# Altium PCB iR-Blaster.PcbDoc
Units mil, origin at the board's own origin, x right, y up, seen from the top; angles counter-clockwise.
Board outline 1958.66 x 1633.86 mil, 2 copper layers (Top Layer, Bottom Layer), stack 59.055 mil thick; 49 components, 32 nets, 174 pads, 48 vias.
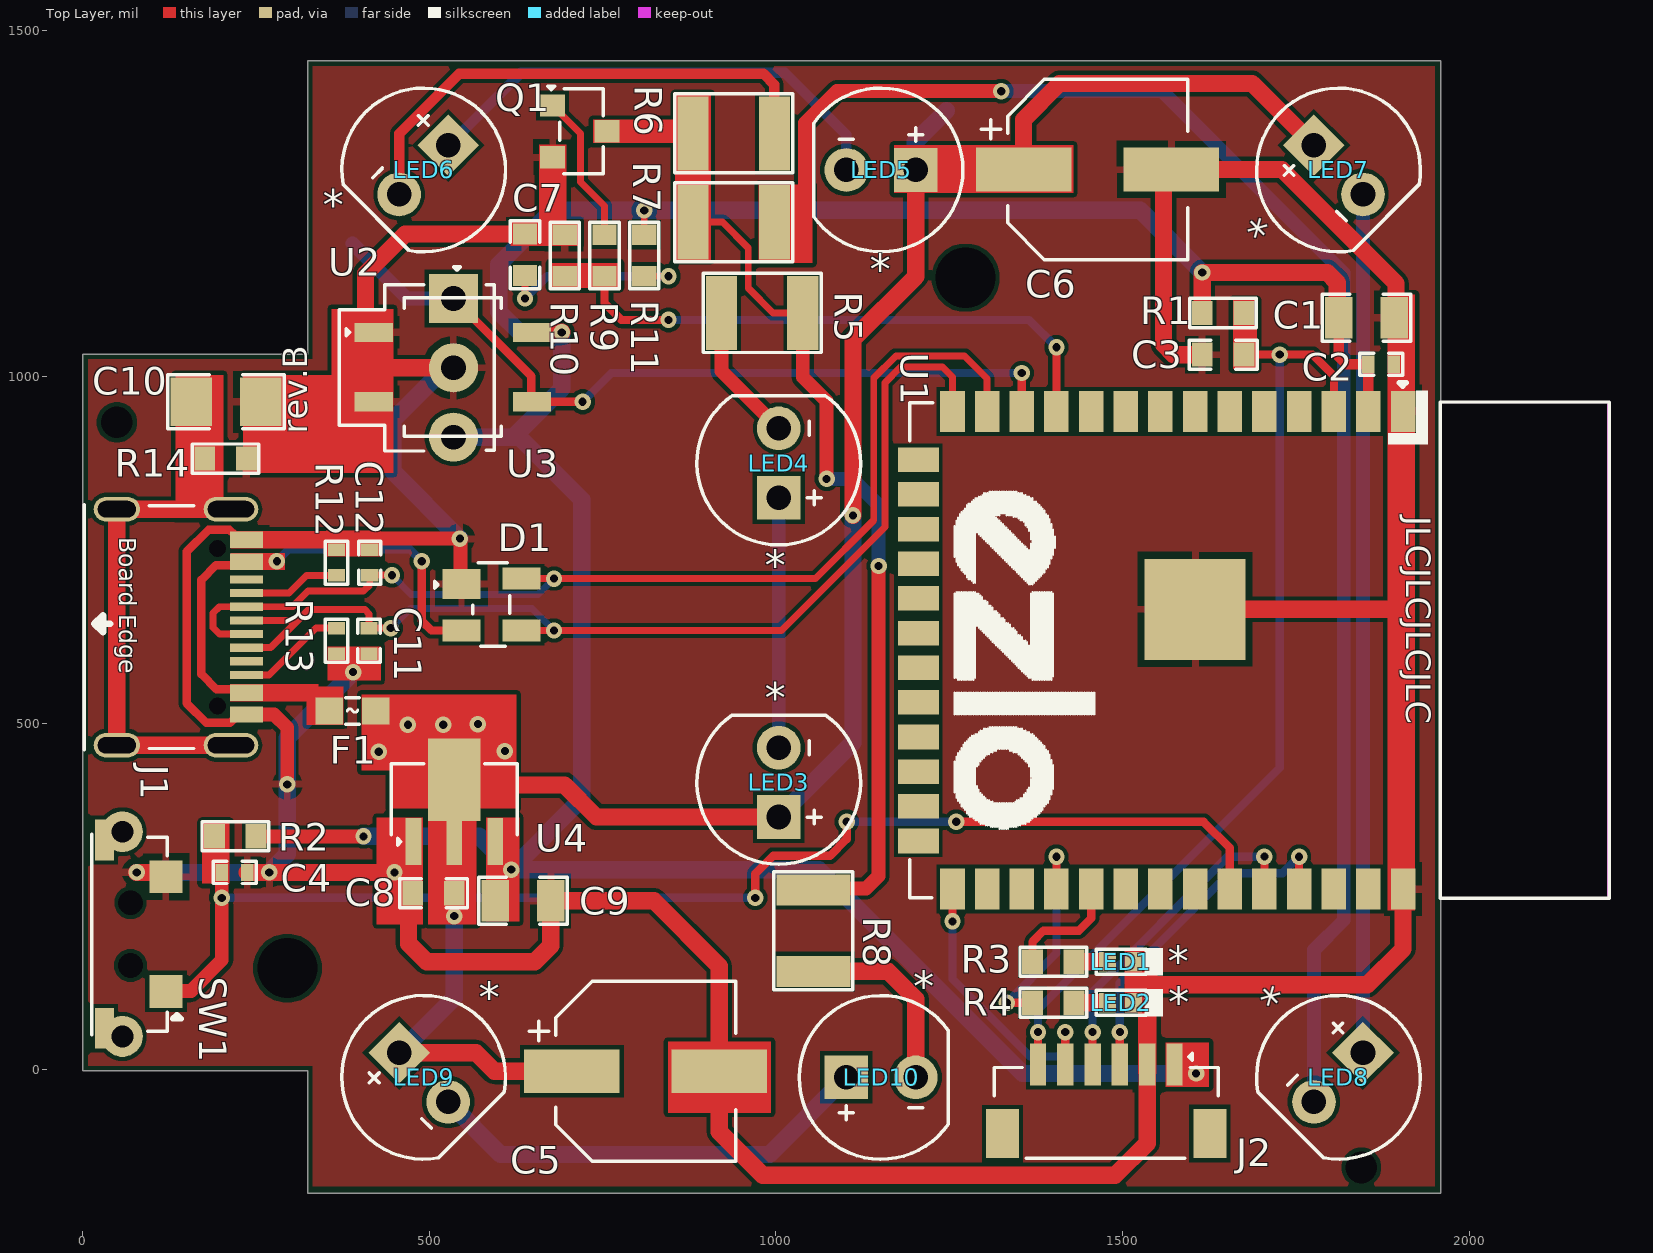
[diagram p0: Top Layer view]
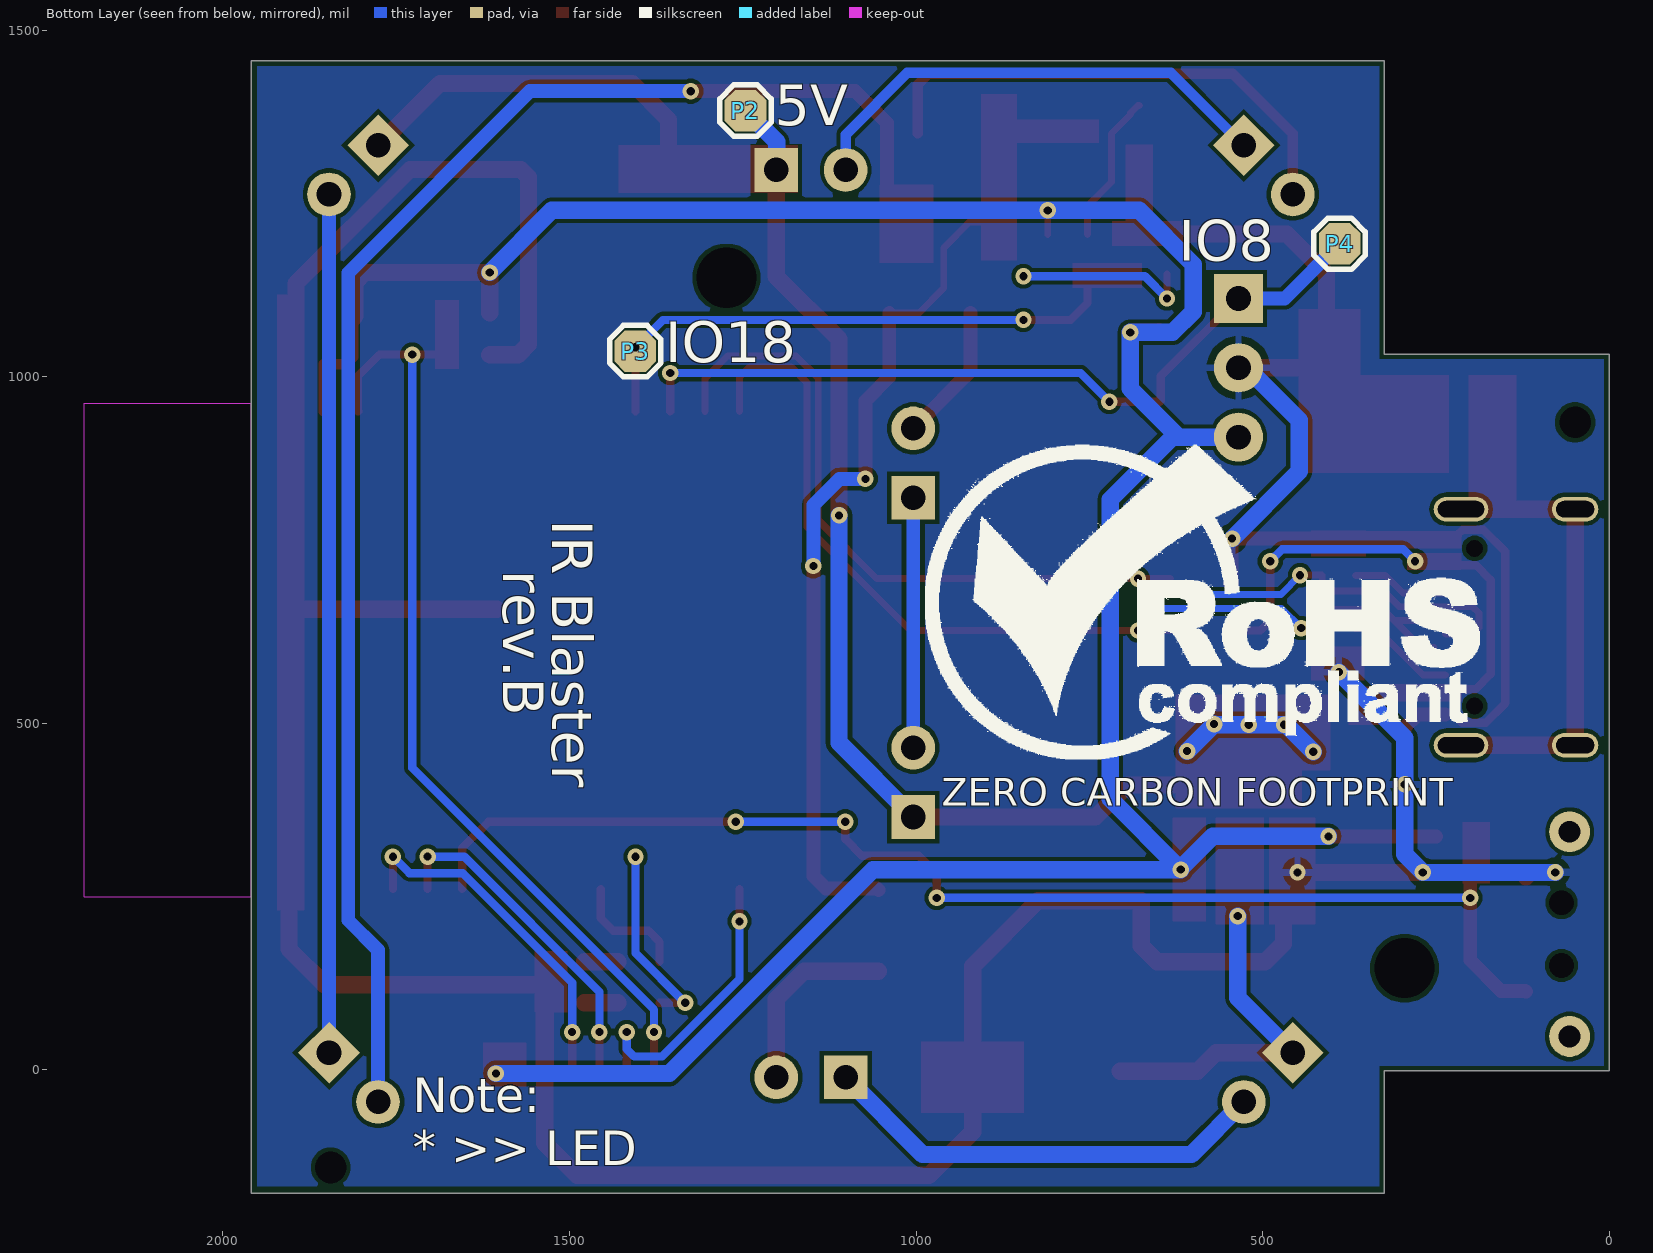
[diagram p1: Bottom Layer view, seen from below]
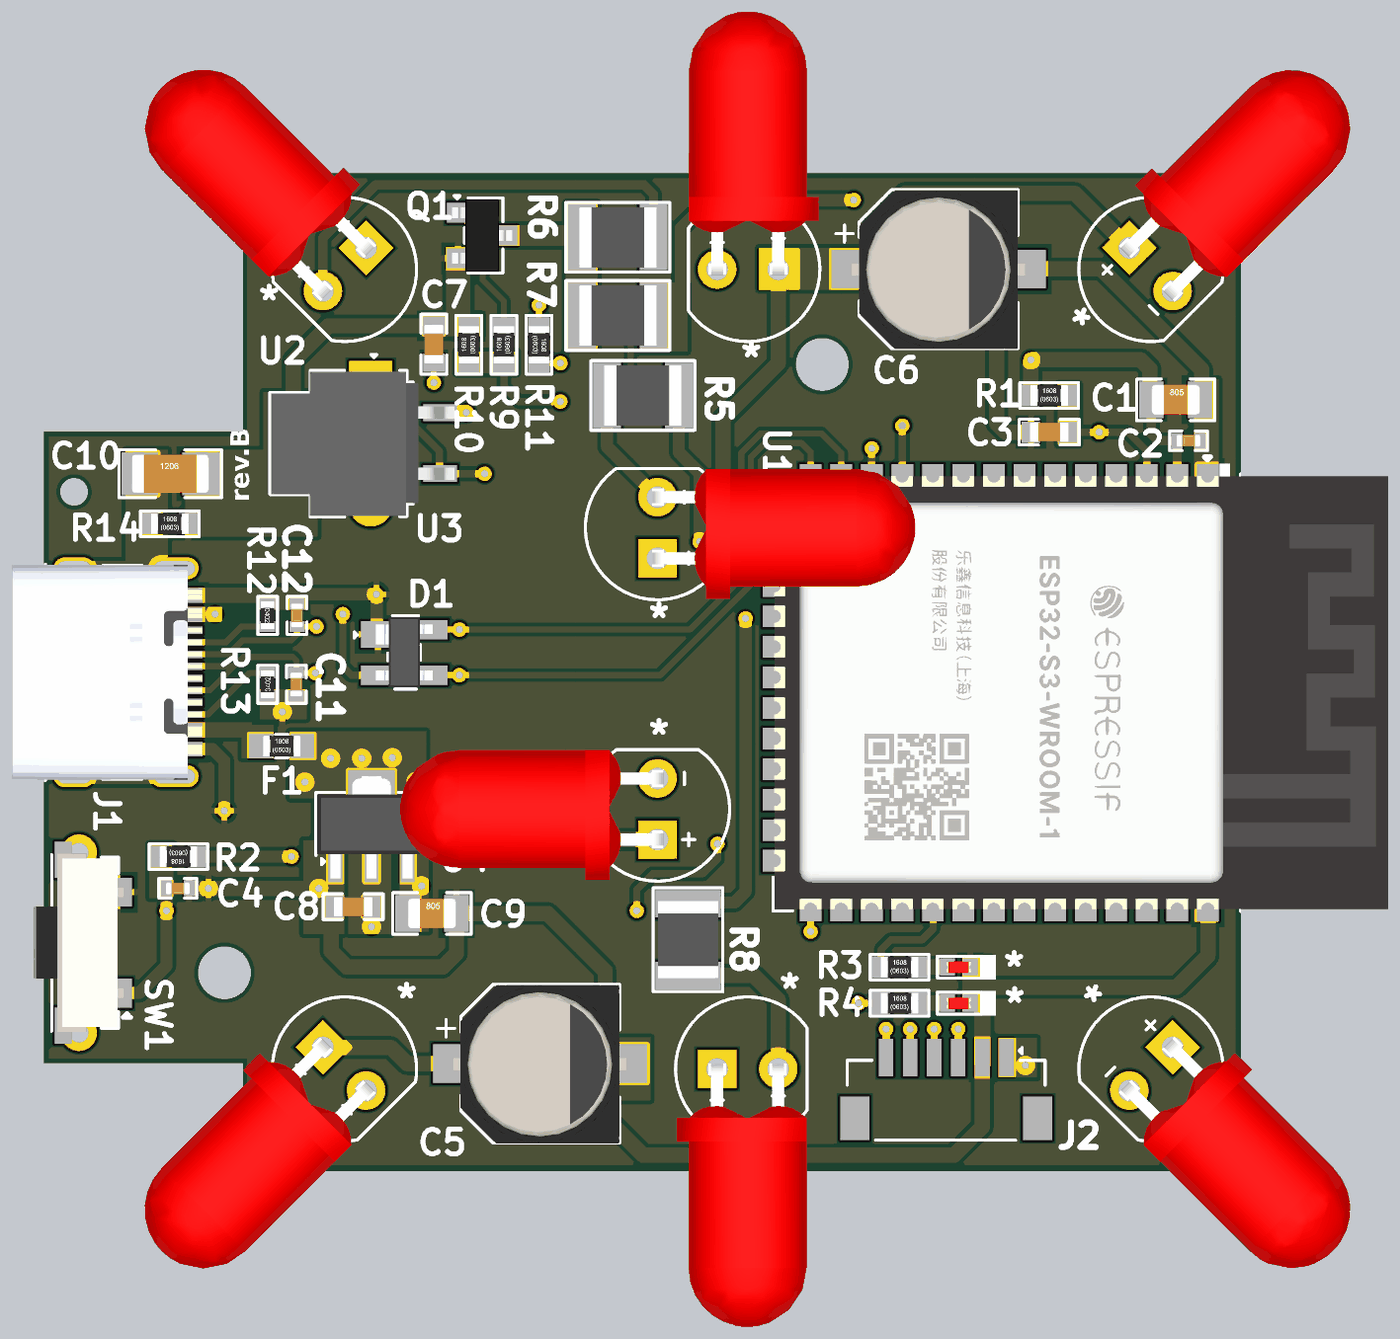
[diagram p2: 3D render of the assembled board from above, using the file's embedded part models]

## Layer stack, top to bottom
Top Solder: solder mask 0.4, Solder Resist, Dk 3.5
Top Layer: signal copper 1.378
Dielectric 2: prepreg 7.874, PP-006, Dk 4.1
Dielectric 1: core 40.551, FR-4, Dk 4.8
Dielectric 3: prepreg 7.874, PP-006, Dk 4.1
Bottom Layer: signal copper 1.378
Bottom Solder: solder mask 0.4, Solder Resist, Dk 3.5

## Board outline
0,-0.83 324.8,-0.83 324.8,-178 1958.66,-178 1958.66,1455.86 324.8,1455.86 324.8,1032.63 0,1032.63

## Design rules (kind name [scope] priority, off if disabled: settings)
Clearance [All] p1: gap=6 ignorepadtopadclearanceinfootprint=FALSE
ComponentClearance [All] p1: gap=0 collisioncheckmode=3 verticalgap=0 showdistances=FALSE
HoleSize [All] p1: absolutevalues=TRUE maxlimit=1000 minlimit=1 maxpercent=80.000 minpercent=20.000
HoleToHoleClearance [All] p1: gap=0 allowstackedmicrovias=TRUE
MinimumSolderMaskSliver [All] p1: minsoldermaskwidth=0
PolygonConnect [All] p1: connectstyle=Relief reliefconductorwidth=10 reliefentries=4 polygonreliefangle="90 Angle" airgapwidth=10
RoutingVias [All] p1: holewidth=11.81 width=23.62 viastyle="Through Hole" minholewidth=11.81 minwidth=23.62 maxholewidth=31.5 maxwidth=62.99
SilkToSilkClearance [All] p1: silktosilkclearance=0
SilkToSolderMaskClearance [IsPad] p1: minsilkscreentomaskgap=0 clearancetoexposedcopper=TRUE
SolderMaskExpansion [All] p1: expansion=4 istentingtop=FALSE
Width [All] p1: maxlimit=25 minlimit=10 preferedwidth=15
24 further rules are at their usual default settings.

## Classes and differential pairs
component class "USB & LDO_Section": C8 C9 C10 C11 C12 D1 F1 J1 R12 R13 R14 U4
component class iR_Receiver_Section: C7 P4 R11 U2 U3
component class iR-Blaster_Section: C5 C6 LED3 LED4 LED5 LED6 LED7 LED8 LED9 LED10 P2 P3 Q1 R5 R6 R7 R8 R9 R10
component class Controller_Section: C1 C2 C3 C4 J2 LED1 LED2 R1 R2 R3 R4 SW1 U1

## Components (designator, comment, footprint, x,y, rotation, side; value= is the part's Value field where it differs from the comment)
C1 "22uF" Cap-0805 1852,1085 r0 top locked
C2 "0.1uF" Cap-0402 1873,1018 r0 top locked
C3 "1uF" Cap-0603 1645,1032 r0 top locked
C4 "0.1uF" Cap-0402 219,285 r180 top locked
C5 "220uF" RT1A221M0605 812,-2 r0 top locked
C6 "220uF" RT1A221M0605 1464,1299 r0 top locked
C7 "4.7UF" Cap-0603 638,1176 r270 top locked
C8 "10uF" Cap-0603 506,255 r180 top locked
C9 "22uF" Cap-0805 635,244 r0 top locked
C10 "4.7nF" Cap-1206 206.66,963.86 r0 top locked
C11 "TBD" Cap-0402 413,619 r270 top locked
C12 "TBD" Cap-0402 414,732 r90 top locked
D1 "SP0503BAHTG" SOT-143-4_ 546.39,700.93 r0 top locked
F1 "BSMD0603L-100" fuse-0603 389,518 r0 top locked
J1 "TYPE-C-31-M-12" TYPE-C-31-M-12_ 236.22,764.72 r270 top locked
J2 "Voltlink Target" "Voltlink Target" 1476.38,-41.7 r180 top locked
LED1 "Green" LED-0402 1497,156 r0 top locked
LED2 "Red" LED-0402 1497,97 r0 top locked
LED3 "IR333-A" "IR333-A Cut" 1004,414.91 r270 top locked
LED4 "IR333-A" IR333_A 1004,875.54 r90 top locked
LED5 "IR333-A" IR333_A 1151.57,1298.38 r180 top locked
LED6 "IR333-A" IR333_A 491.73,1298.38 r225 top locked
LED7 "IR333-A" "IR333-A CUT" 1811.42,1298.38 r135 top locked
LED8 "IR333-A" "IR333-A CUT" 1811.42,-10.68 r45 top locked
LED9 "IR333-A" IR333_A 491.73,-10.68 r315 top locked
LED10 "IR333-A" IR333_A 1151.57,-10.68 r0 top locked
P2 "TEST POINT" Test-point 1246,1384 r180 bottom locked
P3 "TEST POINT" Test-point 1405,1037 r180 bottom locked
P4 "TEST POINT" Test-point 389,1192 r180 bottom locked
Q1 "YJL2302B" SOT-23-3L_ 717,1354 r270 top locked
R1 "10K" RES-0603 1645,1092 r180 top locked
R2 "10K" RES-0603 220,337 r0 top locked
R3 "330R" Res-0603 1400,156 r180 top locked
R4 "330R" Res-0603 1400,97 r180 top locked
R5 "27R" Res_1210 980,1092 r180 top locked
R6 "27R" Res_1210 939,1351 r0 top locked
R7 "27R" Res_1210 939,1223 r0 top locked
R8 "27R" Res_1210 1054,201 r270 top locked
R9 "100R" Res-0603 752.67,1175 r270 top locked
R10 "10K" RES-0603 695.33,1175 r270 top locked
R11 "100R" Res-0603 810,1175 r90 top locked
R12 "5.1K" Res-0402 366,732 r270 top locked
R13 "5.1K" Res-0402 366,619 r90 top locked
R14 "1M" Res-0603 206,882 r180 top locked
SW1 "YTS-B003-2A" YTS-B003-2A 75.79,196.02 r90 top locked
U1 "ESP32-S3-WROOM-1-N4" "41-SMD Module" 1555,605.51 r270 top locked
U2 "IRM-H638T/TR2" SMD-4,4x5mm 534,1014 r0 top locked
U3 "IRM-3638T" SIP-3P-2.54mm 534.83,1012.94 r270 top locked
U4 "LR1107G-33-AB3-C-R" SOT-89-3 536,374 r0 top locked

## Footprints (in the part's own frame and the unit in brackets; to place one, negate y for a bottom-side part, rotate by r counter-clockwise, add the part's x,y. Pads: shape width x height; smd on the part's side, far side on the other; paste and mask are expansions set on the pad)
"41-SMD Module" [mm]
  rect 1.5x0.9 smd: 1(-8.75,8.88) 2(-8.75,7.61) 3(-8.75,6.34) 4(-8.75,5.07) 5(-8.75,3.8) 6(-8.75,2.53) 7(-8.75,1.26) 8(-8.75,-0.01) 9(-8.75,-1.28) 10(-8.75,-2.55) 11(-8.75,-3.82) 12(-8.75,-5.09) 13(-8.75,-6.36) 14(-8.75,-7.63) 27(8.75,-7.63) 28(8.75,-6.36) 29(8.75,-5.09) 30(8.75,-3.82) 31(8.75,-2.55) 32(8.75,-1.28) 33(8.75,-0.01) 34(8.75,1.26) 35(8.75,2.53) 36(8.75,3.8) 37(8.75,5.07) 38(8.75,6.34) 39(8.75,7.61) 40(8.75,8.88)
  rect 0.9x1.5 smd: 15(-6.98,-8.88) 16(-5.71,-8.88) 17(-4.44,-8.88) 18(-3.17,-8.88) 19(-1.9,-8.88) 20(-0.63,-8.88) 21(0.64,-8.88) 22(1.91,-8.88) 23(3.18,-8.88) 24(4.45,-8.88) 25(5.72,-8.88) 26(6.99,-8.88)
  rect 3.7x3.7 smd: 41(-1.5,1.26)
  Keep-Out Layer region: -9.042,10.285 9.042,10.285 9.042,16.381 -9.042,16.381
  silkscreen extent -9.8,-9.2 9.09,16.43, body extent -9.01,-9.14 9.01,16.37, height 3.16
Cap-0402 [mil]
  rect 18x25 smd mask+2.36: 1(-18.5,0) 2(18.5,0)
  silkscreen extent -31,-16 31,16, body extent -20,-10 20,10, height 19
Cap-0603 [mil]
  rect 30x35 smd mask+2.36: 1(-30,0) 2(30,0)
  silkscreen extent -49,-21 49,21, body extent -32,-16 31,16, height 34
Cap-0805 [mil] "SMD 0805"
  rect 40x60 smd mask+2.76: 1(-40,0) 2(40,0)
  silkscreen extent -64,-34 64,34, body extent -39,-25 39,25, height 30
Cap-1206 [mil] "SMD 1206"
  rect 60x70 smd: 1(-50,0) 2(50,0)
  silkscreen extent -84,-39 84,39, body extent -63,-31 63,32, height 39
fuse-0603 [mm]
  rect 1x1 smd: 1(-0.85,0) 2(0.85,0)
  silkscreen extent -0.25,-0.48 0.25,0.48, body extent -0.77,-0.42 0.78,0.43, height 0.45
"IR333-A Cut" [mm]
  rect 1.6x1.6 hole 0.9: 1(1.27,0)
  round 1.6 hole 0.9: 2(-1.27,0)
  silkscreen extent -2.47,-3 3,3, body extent -2.45,-10.7 2.95,0.25, height 7.95
"IR333-A CUT" [mm]
  rect 1.6x1.6 hole 0.9: 1(1.27,0)
  round 1.6 hole 0.9: 2(-1.27,0)
  silkscreen extent -2.47,-3 3,3, body extent -2.45,-10.7 2.95,0.25, height 7.95
IR333_A [mm]
  rect 1.6x1.6 hole 0.9: 1(-1.27,0)
  round 1.6 hole 0.9: 2(1.27,0)
  silkscreen extent -3,-3 2.47,3, body extent -2.95,-10.72 2.45,0.23, height 7.95
LED-0402 [mm]
  rect 0.62x0.72 smd: 1(-0.475,0) 2(0.475,0)
  silkscreen extent -0.89,-0.51 1.55,0.51, body extent -0.5,-0.25 0.51,0.25, height 0.45
Res-0402 [mil]
  rect 18x25 smd mask+2.17: 1(-18.5,0) 2(18.5,0)
  silkscreen extent -32,-17 32,16, body extent -23,-11 23,11, height 16
RES-0603 [mil]
  rect 30x35 smd: 1(-30,0) 2(30,0)
  silkscreen extent -48,-21 48,21, body extent -31,-17 31,17, height 18
Res-0603 [mil]
  rect 30x35 smd: 1(-30,0) 2(30,0)
  silkscreen extent -48,-21 48,21, body extent -31,-17 31,17, height 18
Res_1210 [mm]
  rect 1.14x2.72 smd: 1(-1.49,0) 2(1.49,0)
  silkscreen extent -2.16,-1.45 2.16,1.45, body extent -1.6,-1.25 1.6,1.25, height 0.7
RT1A221M0605 [mm]
  rect 3.5x1.6 smd: 1(-2.7,0) 2(2.7,0)
  silkscreen extent -4.27,-3.3 3.3,3.3, body extent -3.61,-3.33 3.59,3.27, height 5.4
SIP-3P-2.54mm [mm]
  rect 1.8x1.8 hole 0.9: 1(-2.54,0)
  round 1.8 hole 0.9: 2(0,0) 3(2.54,0)
  silkscreen extent -3.71,-4.19 3.05,1.5, body extent -3,-4.14 3,1.46, height 8.35
SMD-4,4x5mm [mm]
  rect 1.4x0.7 smd: 1(-2.9,1.27) 2(-2.9,-1.27) 3(2.9,-1.27) 4(2.9,1.27)
  silkscreen extent -3.91,-2.54 1.78,2.54, body extent -3.5,-2.5 3.5,2.5, height 3.99
SOT-23-3L_ [mm]
  rect 0.82x0.92 smd: 1(-0.95,-1) 2(0.95,-1) 3(0,1)
  silkscreen extent -1.65,-1.17 1.56,0.86, body extent -1.5,-1.25 1.5,1.25, height 1.1
SOT-89-3 [mm]
  rect 0.58x1.73 smd: 1(-1.5,-1.132) 2(0,-1.132) 3(1.5,-1.132)
  rect 1.933x3.03 smd: 2(0,1.132)
  silkscreen extent -2.31,-1.27 2.31,1.73, body extent -2.25,-1.84 2.25,2.41, height 1.54
SOT-143-4_ [mm]
  rect 1.4x1.1 smd: 1(0,0)
  rect 1.4x0.8 smd: 2(0,-1.7) 3(2.2,-1.7) 4(2.2,0.2)
  silkscreen extent -0.99,-2.27 1.76,0.77, body extent -0.08,-2.21 2.29,0.71, height 1.22
Test-point [mil]
  oct 60x60 smd: 1(0,0)
  silkscreen extent -37,-37 37,37
TYPE-C-31-M-12_ [mm]
  rect 0.6x1.2 smd: A1/B12(0,0) A4/B9(0.8,0) B1/A12(6.4,0) B4/A9(5.6,0)
  rect 0.3x1.2 smd: A5(1.95,0) A6(2.95,0) A7(3.45,0) A8(4.45,0) B5(4.95,0) B6(3.95,0) B7(2.45,0) B8(1.45,0)
  round 0 hole 0.62 unplated: MH(0.31,-1.07) MH(6.09,-1.07)
  oval 0.9x2 hole 0.6 slot 1.7 at 90 deg: S1(7.525,-0.57) S4(-1.125,-0.57)
  oval 0.9x1.7 hole 0.6 slot 1.4 at 90 deg: S2(7.525,-4.75) S3(-1.125,-4.75)
  silkscreen extent -1.3,-5.94 7.7,-1.93, body extent -1.27,-7.32 7.67,0.58, height 3.31
"Voltlink Target" [mm]
  rect 0.6x1.55 smd: 1(-2.5,-1.262) 2(-1.5,-1.262) 3(-0.5,-1.262) 4(0.5,-1.262) 5(1.5,-1.262) 6(2.5,-1.262)
  rect 1.2x1.8 smd: MP1(-3.8,1.262) MP2(3.8,1.262)
  silkscreen extent -4.11,-1.68 4.11,2.17
YTS-B003-2A [mm]
  rect 1.2x1.2 smd: 1(-2.1,-1.125) 2(2.1,-1.125)
  rect 1.5x0.7 smd: 3(3.45,1.125) 4(-3.45,1.125)
  round 1.5 hole 0.8: 5(3.75,0.475) 6(-3.75,0.475)
  round 0 hole 0.9 unplated: MH0(-1.15,0.175) MH1(1.15,0.175)
  silkscreen extent -3.68,-1.68 3.66,1.6, body extent -3.7,-1.37 3.7,2.36, height 3.59

## Part data
C1 C9: library part CL21A226MAYNNNE, "CAP CER 22UF 25V X5R 0805", LCSC Part Number=C602037, Manufacturer=Samsung, Supplier Part Number 1=187-CL21A226MAYNNNE, Category="Ceramic Capacitors", Manufacturer Part Number=CL21A226MAYNNNE, Pricing 1="1=0.28000, 10=0.18500, 50=0.18500, 100=0.10600, 500=0.07500, 1000=0.06400, 2000=0.06100, 10000=0.05400, 24000=0.05100, 50000=0.04600 (USD)", RoHS=Yes, RoHS Compliant=Yes, Stock 1=1240410, Supplier 1=Mouser
C2 C4: library part C1005X5R1H104K050BB, "CAP CER 0.1UF 50V X5R 0402", Capacitance=100nF, Case Code (Imperial)=0402, Case Code (Metric)=1005, Dielectric=X5R, Dielectric Material=Ceramic, LCSC Part Number=C2181865, Manufacturer=TDK, Max Operating Temperature=85°C, Min Operating Temperature=-55°C, Package Quantity=1, Supplier Part Number 1=445-5942-1-ND, Tolerance=10%, Voltage=50V, Case/Package=0402, ComponentLink1Description=https://product.tdk.com/info/en/catalog/spec/mlccspec_commercial_general_midvoltage_en.pdf?src-supplier=Digi-Key, ComponentLink1URL=https://product.tdk.com/info/en/catalog/spec/mlccspec_commercial_general_midvoltage_en.pdf?src-supplier=Digi-Key, ComponentLink2Description=http://www.tdk.co.jp/tefe02/e413_c.pdf?src-supplier=Future+Electronics, ComponentLink2URL=http://www.tdk.co.jp/tefe02/e413_c.pdf?src-supplier=Future+Electronics, ComponentLink3Description=https://www.verical.com/server-webapp/html/getDatasheet?partID=743571&src-supplier=Verical, ComponentLink3URL=https://www.verical.com/server-webapp/html/getDatasheet?partID=743571&src-supplier=Verical, ComponentLink4Description=http://www.tdk.co.jp/tefe02/e412_c.pdf?src-supplier=Avnet+Europe, ComponentLink4URL=http://www.tdk.co.jp/tefe02/e412_c.pdf?src-supplier=Avnet+Europe, Construction=Flat, Depth=0.5mm, Height=0.5mm, Lead Free="Lead Free", Length=1mm, Manufacturer Part Number=C1005X5R1H104K050BB, Mount="Surface Mount", Packaging="Tape and Reel", Pricing 1="1=0.12, 10=0.09, 50=0.049, 100=0.04, 500=0.02858, 1000=0.02245, 2500=0.02041, 5000=0.01878 (USD)", Radiation Hardening=No, REACH SVHC="No SVHC", Resistor Type=Ceramic, RoHS Compliant=Yes, Series=C, Stock 1=1455182, Supplier 1=Digi-Key, Termination=SMD/SMT, Thickness=0.022inch, Voltage Rating=50V, Voltage Rating (DC)=50V, Weight=2.3E-05oz, Width=0.02inch
C3: library part CC0603KRX5R8BB105, "CAP CER 1UF 25V X5R 0603", Case Code (Imperial)=0603, Case Code (Metric)=1608, Dielectric=X5R, LCSC Part Number=C14664, Manufacturer=Yageo, Max Operating Temperature=85°C, Min Operating Temperature=-55°C, Package Quantity=1, Supplier Part Number 1=311-1445-1-ND, Tolerance=10%, Voltage Rating=25V, Capacitance=1uF, Case/Package=0603, Category="Ceramic Capacitors", ComponentLink1Description=https://datasheet.ciiva.com/176/mlccorderingcode-176785.pdf?src-supplier=Digi-Key, ComponentLink1URL=https://datasheet.ciiva.com/176/mlccorderingcode-176785.pdf?src-supplier=Digi-Key, ComponentLink2Description=https://datasheet.ciiva.com/176/mlccorderingcode-176786.pdf?src-supplier=Digi-Key, ComponentLink2URL=https://datasheet.ciiva.com/176/mlccorderingcode-176786.pdf?src-supplier=Digi-Key, ComponentLink3Description=https://datasheet.ciiva.com/176/mlccorderingcode-176787.pdf?src-supplier=Digi-Key, ComponentLink3URL=https://datasheet.ciiva.com/176/mlccorderingcode-176787.pdf?src-supplier=Digi-Key, ComponentLink4Description=https://datasheet.ciiva.com/17436/upy-gphc-x5r-4v-to-50v-12-17436952.pdf?src-supplier=Avnet+Europe, ComponentLink4URL=https://datasheet.ciiva.com/17436/upy-gphc-x5r-4v-to-50v-12-17436952.pdf?src-supplier=Avnet+Europe, ComponentLink5Description=https://datasheet.ciiva.com/7978/1525783-7978171.pdf?src-supplier=Element14, ComponentLink5URL=https://datasheet.ciiva.com/7978/1525783-7978171.pdf?src-supplier=Element14, ComponentLink6Description=https://datasheet.ciiva.com/11586/upy-gphc-x5r-4v-to-50v-12-11586318.pdf?src-supplier=Avnet, ComponentLink6URL=https://datasheet.ciiva.com/11586/upy-gphc-x5r-4v-to-50v-12-11586318.pdf?src-supplier=Avnet, Construction=Flat, Depth=0.8mm, Halogen Free="Halogen Free", Height=0.8mm, Lead Free="Lead Free", Length=1.6mm, Manufacturer Part Number=CC0603KRX5R8BB105, Mount="Surface Mount", Number of Pins=2, Packaging="Tape and Reel", Pricing 1="1=0.12000, 10=0.08400, 50=0.04760, 100=0.03940, 500=0.02764, 1000=0.02288 (USD)", Radiation Hardening=No, REACH SVHC="No SVHC", RoHS=Yes, RoHS Compliant=Yes, Series=CC, Stock 1=919939, Supplier 1=Digi-Key, Termination=SMD/SMT, Thickness=0.035inch, Voltage Rating (DC)=25V, Width=0.031inch
C5 C6: library part RT1A221M0605, "220uF 5.4mm 10V 6.3mm ±20% SMD,D6.3xL5.4mm Aluminum Electrolytic Capacitors - SMD ROHS", LCSC Part Number=C267466, Manufacturer=ROQANG, Package=SMD,D6.3xL5.4mm, ComponentLink1Description=LCSC, ComponentLink1URL=https://lcsc.com/product-detail/Aluminum-Electrolytic-Capacitors-SMD_ROQANG-RT1A221M0605_C267466.html, Item Type=Capacitor, Manufacturer Part Number=RT1A221M0605
C7: library part CL10A475KA8NQNC, "CAP CER 4.7UF 25V X5R 0603", Capacitance=4.7uF, Case Code (Imperial)=0603, Case Code (Metric)=1608, Dielectric=X5R, LCSC Part Number=C69335, Manufacturer=Samsung, Max Operating Temperature=85°C, Min Operating Temperature=-55°C, Package Quantity=1, Supplier Part Number 1=1276-1900-1-ND, Tolerance=10%, Voltage Rating=25V, Case/Package=0603, ComponentLink1Description=http://www.samsungsem.com/kr/support/product-search/mlcc/CL10A475KA8NQNC.jsp?src-supplier=Digi-Key, ComponentLink1URL=http://www.samsungsem.com/kr/support/product-search/mlcc/CL10A475KA8NQNC.jsp?src-supplier=Digi-Key, Contact Plating=Tin, Depth=0.8mm, Lead Free="Lead Free", Length=1.6mm, Manufacturer Part Number=CL10A475KA8NQNC, Mount="Surface Mount", Packaging="Tape and Reel", Pricing 1="1=0.37, 10=0.255, 100=0.1528, 500=0.11456, 1000=0.09675 (USD)", Stock 1=2252340, Supplier 1=Digi-Key, Termination=Wraparound, Thickness=0.035inch, Width=0.031inch
C8: library part C1608X5R1E106M080AC, "CAP CER 10UF 25V X5R 0603", Case Code (Imperial)=0603, Case Code (Metric)=1608, Dielectric=X5R, Dielectric Material=Ceramic, LCSC Part Number=C2168289, Manufacturer=TDK, Max Operating Temperature=85°C, Min Operating Temperature=-55°C, Package Quantity=1, Supplier Part Number 1=445-9015-1-ND, Tolerance=20%, Voltage Rating=25V, Capacitance=10uF, Case/Package=0603, Composition=Ceramic, Depth=0.8mm, Height=0.8mm, Lead Free="Lead Free", Length=1.6mm, Manufacturer Part Number=C1608X5R1E106M080AC, Mount="Surface Mount", Packaging="Tape and Reel", Pricing 1="1=0.96, 10=0.704, 100=0.483, 500=0.38238, 1000=0.322 (USD)", REACH SVHC="No SVHC", Stock 1=61681, Supplier 1=Digi-Key, Termination=SMD/SMT, Thickness=0.039inch, Voltage Rating (DC)=25V, Weight=7.1E-05oz, Width=0.8mm
C10: library part CC1206KKX7RCBB472, "CAP CER 4700PF 1KV X7R 1206", Case Code (Imperial)=1206, Case Code (Metric)=3216, Dielectric=X7R, Dielectric Material=Ceramic, LCSC Part Number=C107198, Manufacturer=Yageo, Max Operating Temperature=125°C, Min Operating Temperature=-55°C, Supplier Part Number 1=7130131, Tolerance=10%, Voltage Rating=1kV, Capacitance=4.7nF, Case/Package=1206, Category="Ceramic Capacitors", ComponentLink1Description=https://datasheet.ciiva.com/13208/upy-gp-np0-16v-to-50v-8-13208693.pdf?src-supplier=Mouser, ComponentLink1URL=https://datasheet.ciiva.com/13208/upy-gp-np0-16v-to-50v-8-13208693.pdf?src-supplier=Mouser, ComponentLink2Description=https://datasheet.ciiva.com/11466/hv-11466701.pdf?src-supplier=Avnet, ComponentLink2URL=https://datasheet.ciiva.com/11466/hv-11466701.pdf?src-supplier=Avnet, Depth=1.6mm, Item Type=Capacitor, Lead Free="Lead Free", Length=3.2mm, Manufacturer Part Number=CC1206KKX7RCBB472, Mount="Surface Mount", Number of Pins=2, Packaging="Tape and Reel", Pricing 1="3000=0.02860, 9000=0.02750, 15000=0.02700, 45000=0.02600, 75000=0.02510 (USD)", Radiation Hardening=No, Resistor Type=Ceramic, RoHS=Yes, RoHS Compliant=Yes, Series=CC, Stock 1=180000, Supplier 1="Future Electronics", Termination=SMD/SMT, Thickness=0.057inch, Voltage Rating (DC)=1kV, Weight=0.000571oz, Width=0.063inch
C11 C12: library part "Capacitor 0402", "DO Not Mount"
D1: "ESD Suppressor TVS 5.5V 4-Pin(3+Tab) SOT-143 T/R", Breakdown Voltage=5.5V, Capacitance=30pF, Case/Package=SOT-143, Clamping Voltage=7.8V, Clamping Voltage-Max=8V, LCSC Part Number=C3029025, Leakage Current=100nA, Manufacturer=Littelfuse, Max Operating Temperature=85°C, Max Power Dissipation=225mW, Min Operating Temperature=-40°C, Power Line Protection=No, Resistor Type=Zener, Supplier Part Number 1=F2715CT-ND, Voltage Rating (DC)=5V, Category=Diodes, ComponentLink1Description=https://datasheet.ciiva.com/15143/getdatasheetpartid-116020-15143550.pdf?src-supplier=Verical, ComponentLink1URL=https://datasheet.ciiva.com/15143/getdatasheetpartid-116020-15143550.pdf?src-supplier=Verical, ComponentLink2Description=https://datasheet.ciiva.com/332/sp05xxba-332550.pdf?src-supplier=Digi-Key, ComponentLink2URL=https://datasheet.ciiva.com/332/sp05xxba-332550.pdf?src-supplier=Digi-Key, ComponentLink3Description=https://datasheet.ciiva.com/8062/littefuse-spa-sp050x-8062422.pdf?src-supplier=Element14, ComponentLink3URL=https://datasheet.ciiva.com/8062/littefuse-spa-sp050x-8062422.pdf?src-supplier=Element14, ComponentLink4Description=https://datasheet.ciiva.com/22697/1911798-22697942.pdf?src-supplier=Element14, ComponentLink4URL=https://datasheet.ciiva.com/22697/1911798-22697942.pdf?src-supplier=Element14, ComponentLink5Description=https://datasheet.ciiva.com/332/sp05xxba-332551.pdf?src-supplier=Digi-Key, ComponentLink5URL=https://datasheet.ciiva.com/332/sp05xxba-332551.pdf?src-supplier=Digi-Key, ComponentLink6Description=https://datasheet.ciiva.com/16449/sp05xxba-16449463.pdf?src-supplier=Future+Electronics, ComponentLink6URL=https://datasheet.ciiva.com/16449/sp05xxba-16449463.pdf?src-supplier=Future+Electronics, ComponentLink7Description=https://datasheet.ciiva.com/332/sp05xxba-332552.pdf?src-supplier=Digi-Key, ComponentLink7URL=https://datasheet.ciiva.com/332/sp05xxba-332552.pdf?src-supplier=Digi-Key, ComponentLink8Description=https://datasheet.ciiva.com/4509/sp05x-leadfree-4509162.pdf?src-supplier=Mouser, ComponentLink8URL=https://datasheet.ciiva.com/4509/sp05x-leadfree-4509162.pdf?src-supplier=Mouser, ComponentLink9Description=https://datasheet.ciiva.com/7650/526672-7650894.pdf?src-supplier=Element14, ComponentLink9URL=https://datasheet.ciiva.com/7650/526672-7650894.pdf?src-supplier=Element14, Depth=1.4mm, Diode Type=Avalanche, Direction=Unidirectional, Element Configuration="Common Anode", ESD Protection=Yes, Height=1.05mm, Lead Free="Lead Free", Length=3.04mm, Manufacturer Part Number=SP0503BAHTG, Max Reverse Leakage Current=100nA, Mount="Surface Mount", Number of Channels=3, Number of Elements=3, Number of Pins=4, Number of Unidirectional Channels=3, Operating Supply Voltage=5.5V, Packaging="Tape and Reel", Peak Pulse Power=225mW, Polarity=Bidirectional,Unidirectional, Power Dissipation=225mW, Pricing 1="1=0.92000, 10=0.81200, 100=0.62260, 500=0.49214, 1000=0.39371 (USD)", Radiation Hardening=No, REACH SVHC="No SVHC", Reverse Standoff Voltage=5.5V, RoHS=Yes, RoHS Compliant=Yes, Series="SP05, SPA®", Stock 1=651, Supplier 1=Digi-Key, Termination=SMD/SMT, Width=1.4mm, Working Voltage=5.5V
F1: "6V 1A 50A 1W -40℃~+85℃ 2A 9mΩ 0.5s 80mΩ 0603 Resettable Fuses ROHS", LCSC Part Number=C2757929, Manufacturer=BHFUSE, Package=0603, ComponentLink1Description=LCSC, ComponentLink1URL=https://lcsc.com/product-detail/Resettable-Fuses_BHFUSE-BSMD0603L-100_C2757929.html, Item Type=Fuse, Manufacturer Part Number=BSMD0603L-100
J1: "250mA 1 16 Female Type-C SMD USB Connectors ROHS", LCSC Part Number=C165948, Manufacturer="Korean Hroparts Elec", ComponentLink1Description=LCSC, ComponentLink1URL=https://www.lcsc.com/product-detail/USB-Connectors_Korean-Hroparts-Elec-TYPE-C-31-M-12_C165948.html, Manufacturer Part Number=TYPE-C-31-M-12
J2: "DNP"
LED1: library part 16-213/GHC-YR1S1/3T, "Green 520~535nm 0402 Light Emitting Diodes (LED) RoHS", LCSC Part Number=C74338, Manufacturer="Everlight Elec", Package=0402, ComponentLink1Description=LCSC, ComponentLink1URL=https://www.lcsc.com/product-detail/Light-Emitting-Diodes-LED_Everlight-Elec-16-213-GHC-YR1S1-3T_C74338.html, Dominant Wavelength / Coordinate rank=520~535nm, Illumination Color=Green, Item Type=LED, Luminous Intensity (IF=20mA)=112~285mcd, Manufacturer Part Number=16-213/GHC-YR1S1/3T, Mounting Type="Surface Mount"
LED2: library part XZMDK68W-2, "LED RED CLEAR CHIP SMD", Case Code (Imperial)=0402, Case Code (Metric)=1005, Forward Voltage=1.95V, Lens Color=Colorless, Manufacturer=SunLED, Supplier Part Number 1=1497-1174-6-ND, Test Current=20mA, Case/Package=0402, Color=Red, ComponentLink1Description=http://www.sunledusa.com/products/spec/XZMDK68W-2.pdf?src-supplier=Digi-Key, ComponentLink1URL=http://www.sunledusa.com/products/spec/XZMDK68W-2.pdf?src-supplier=Digi-Key, ComponentLink2Description=https://www.sunledusa.com/products/spec/XZMDK68W-2.pdf?src-supplier=Digi-Key, ComponentLink2URL=https://www.sunledusa.com/products/spec/XZMDK68W-2.pdf?src-supplier=Digi-Key, Dominant Wavelength=630nm, Height=0.6mm, Item Type=LED, Length=1mm, Lens Transparency=Clear, Luminous Intensity=69mcd, Manufacturer Part Number=XZMDK68W-2, Mount="Surface Mount", Packaging="Tape and Reel", Pricing 1="1=0.43, 10=0.306, 100=0.136, 500=0.0952, 1000=0.0782 (USD)", Stock 1=69539, Supplier 1=Digi-Key, Viewing Angle=120°, Width=0.5mm
LED3 LED4 LED5 LED6 LED7 LED8 LED9 LED10: "EMITTER IR 940NM 100MA RADIAL", Case/Package=Radial, Forward Current=50mA, Forward Voltage=1.2V, LCSC Part Number=C95407, Manufacturer=Everlight, Max Operating Temperature=85°C, Max Power Dissipation=100mW, Min Operating Temperature=-40°C, Package Quantity=500, Reverse Voltage=5V, Supplier Part Number 1=1080-1080-ND, Test Current=20mA, Category=LEDs, ComponentLink1Description=https://datasheet.ciiva.com/2107/201407061516067600-2107736.pdf?src-supplier=Digi-Key, ComponentLink1URL=https://datasheet.ciiva.com/2107/201407061516067600-2107736.pdf?src-supplier=Digi-Key, ComponentLink2Description=https://datasheet.ciiva.com/48438/ir333-a-eng-tds-48438869.pdf?src-supplier=Distrelec, ComponentLink2URL=https://datasheet.ciiva.com/48438/ir333-a-eng-tds-48438869.pdf?src-supplier=Distrelec, Depth=5.9mm, Item Type="Infrared LED", Lead Free="Lead Free", Length=5.9mm, Lens Style=Diffused,Colored,Circular, Manufacturer Part Number=IR333-A, Mount="Through Hole", Number of Elements=1, Number of LEDs=1, Number of Pins=2, Orientation="Top View", Packaging=Bulk, Power Dissipation=100mW, Pricing 1="1=0.54000, 10=0.33000, 100=0.18950, 1000=0.14832, 2000=0.13596, 5000=0.12360, 10000=0.11536, 25000=0.11124 (USD)", RoHS=Yes, RoHS Compliant=Yes, Series=-, Stock 1=73854, Supplier 1=Digi-Key, Viewing Angle=20°, Wavelength=940nm
P2 P3 P4: "Test Point ON"
Q1: "20V 3A 40mΩ@4.5V,3A 700mW 780mV@250uA 29pF@10V N Channel 280pF@10V 2.9nC@4.5V -55℃~+150℃@(Tj) SOT-23-3L MOSFETs ROHS", LCSC Part Number=C699316, Manufacturer="Yangzhou Yangjie Elec Tech", Package=SOT-23-3L, ComponentLink1Description=LCSC, ComponentLink1URL=https://lcsc.com/product-detail/MOSFETs_Yangzhou-Yangjie-Elec-Tech-YJL2302B_C699316.html, Item Type=Mosfet, Manufacturer Part Number=YJL2302B
R1 R2 R10: library part CRGH0603J10K, "RES SMD 10K OHM 5% 1/5W 0603", Case Code (Imperial)=0603, Case Code (Metric)=1608, LCSC Part Number=C2092011, Manufacturer="TE Connectivity Holsworthy", Max Operating Temperature=125°C, Min Operating Temperature=-55°C, Number of Resistors=1, Power Rating=200mW, Resistance=10kR, Resistance Tolerance=5%, Resistor Type="Thick Film,Power resistor", Supplier Part Number 1=A126394DKR-ND, Temperature Coefficient=100ppm/°C, Voltage Rating=50V, Case/Package=0603, ComponentLink1Description=http://www.farnell.com/datasheets/2167052.pdf?src-supplier=Element14, ComponentLink1URL=http://www.farnell.com/datasheets/2167052.pdf?src-supplier=Element14, ComponentLink2Description=https://www.rohm.com/datasheet/ESR01MZPF/esr-e?src-supplier=Digi-Key, ComponentLink2URL=https://www.rohm.com/datasheet/ESR01MZPF/esr-e?src-supplier=Digi-Key, ComponentLink3Description=http://www.farnell.com/datasheets/2007183.pdf?src-supplier=Element14, ComponentLink3URL=http://www.farnell.com/datasheets/2007183.pdf?src-supplier=Element14, Depth=0.8mm, ELV=Compliant, Height=0.45mm, Length=1.6mm, Manufacturer Part Number=CRGH0603J10K, Mount="Surface Mount", Number of Terminations=2, Packaging="Tape and Reel", Pricing 1="1=0.1, 10=0.049, 100=0.02, 1000=0.00899, 2500=0.0078 (USD)", REACH SVHC="No SVHC", RoHS Compliant=Yes, Series=CRGH, Stock 1=85818, Supplier 1=Digi-Key, Technology="THICK FILM", Termination=Solder, Tolerance=5%, Voltage Rating (DC)=50V, Width=0.8mm
R3 R4: library part RC0603JR-07330RL, "RES  SMD 330R 100 mW 0603", Case Code (Imperial)=0603, Case Code (Metric)=1608, LCSC Part Number=C105879, Manufacturer=Yageo, Max Operating Temperature=155°C, Max Power Dissipation=100mW, Min Operating Temperature=-55°C, Package Quantity=5000, Resistance Tolerance=5%, Resistor Type="Thick Film", Supplier Part Number 1=311-330GRCT-ND, Temperature Coefficient=100ppm/°C, Voltage Rating=50V, Case/Package=0603, Category="Chip SMD Resistors", Construction=Rectangular, Depth=0.8mm, Features="Moisture Resistant", Height=0.45mm, Lead Free="Lead Free", Length=1.6mm, Manufacturer Part Number=RC0603JR-07330RL, Military Standard=Not, Number of Pins=2, Number of Terminations=2, Packaging="Tape and Reel", Power Rating=100mW, Pricing 1="1=0.10000, 10=0.02000, 100=0.00800, 1000=0.00360, 2500=0.00312 (USD)", REACH SVHC="No SVHC", Resistance=330R, RoHS=Yes, RoHS Compliant=Yes, Series=RC, Size Code=0603, Stock 1=1074593, Supplier 1=Digi-Key, Termination=SMD/SMT, Tolerance=5%, Voltage Rating (DC)=50V, Width=0.8mm
R5 R6 R7 R8: library part FRC1210F27R0TS, "500mW Thick Film Resistors 200V ±100ppm/℃ 27Ω 1210 Chip Resistor - SMD ROHS", LCSC Part Number=C2960734, Manufacturer=FOJAN, Package=1210, ComponentLink1Description=LCSC, ComponentLink1URL=https://www.lcsc.com/product-detail/Chip-span-style-background-color-ff0-Resistor-span-Surface-Mount_FOJAN-FRC1210F27R0TS_C2960734.html, Item Type=Resistor, Manufacturer Part Number=FRC1210F27R0TS
R9 R11: library part RC0603FR-07100RL, "RES SMD 100 OHM 1% 1/10W 0603", Case Code (Imperial)=0603, Case Code (Metric)=1608, LCSC Part Number=C105588, Manufacturer=Yageo, Max Operating Temperature=155°C, Max Power Dissipation=100mW, Min Operating Temperature=-55°C, Resistance Tolerance=1%, Resistor Type="Thick Film", Temperature Coefficient=100ppm/°C, Voltage Rating=50V, Case/Package=0603, Category="Chip SMD Resistors", Construction=Rectangular, Depth=0.8mm, Features="Moisture Resistant", Height=0.45mm, Lead Free="Lead Free", Length=1.6mm, Manufacturer Part Number=RC0603FR-07100RL, Military Standard=Not, Number of Pins=2, Number of Terminations=2, Packaging="Tape and Reel", Power Rating=100mW, Pricing 1="5000=0.00300, 5000=0.00200, 5000=0.00450, 50000=0.00410, 500000=0.00230, 2500000=0.00140 (USD)", REACH SVHC=Unknown, Resistance=100R, RoHS=Yes, RoHS Compliant=Yes, Series=RC, Size Code=0603, Stock 1=3800000, Supplier 1="Arrow Electronics", Supplier Part Number 1=RC0603FR-07100RL, Technology="THICK FILM", Termination=SMD/SMT, Tolerance=1%, Voltage Rating (DC)=50V, Width=0.8mm
R12 R13: library part ERJ-PA2F5101X, "RES SMD 5.1 KOHM 1% 1/5W 0402", Manufacturer=Panasonic, Supplier Part Number 1=P124488DKR-ND, Manufacturer Part Number=ERJ-PA2F5101X, Pricing 1="1=0.22, 10=0.183, 100=0.0717, 1000=0.03002, 2500=0.02751, 5000=0.02501 (USD)", Stock 1=5235, Supplier 1=Digi-Key
R14: library part RC0603FR-071ML, "RES SMD 1M OHM 1% 1/10W 0603", Case Code (Imperial)=0603, Case Code (Metric)=1608, LCSC Part Number=C105578, Manufacturer=Yageo, Max Operating Temperature=155°C, Min Operating Temperature=-55°C, Package Quantity=5000, Power Rating=100mW, Resistance=1MR, Supplier Part Number 1=311-1.00MHRDKR-ND, Temperature Coefficient=100ppm/°C, Tolerance=1%, Voltage Rating=50V, Case/Package=0603, ComponentLink1Description=http://www.farnell.com/datasheets/2167052.pdf?src-supplier=Mouser, ComponentLink1URL=http://www.farnell.com/datasheets/2167052.pdf?src-supplier=Mouser, ComponentLink2Description=http://www.farnell.com/datasheets/2167052.pdf?src-supplier=Element14, ComponentLink2URL=http://www.farnell.com/datasheets/2167052.pdf?src-supplier=Element14, ComponentLink3Description=http://documents.rs-components.com/techlib://itc_doclist_GB.htm?stockno=5048956&src-supplier=RSComponents, ComponentLink3URL=http://documents.rs-components.com/techlib://itc_doclist_GB.htm?stockno=5048956&src-supplier=RSComponents, Composition="Thick Film", Depth=0.8mm, Height=0.45mm, Lead Free="Lead Free", Length=1.6mm, Manufacturer Part Number=RC0603FR-071ML, Military Standard=Not, Number of Pins=2, Packaging="Tape and Reel", Pricing 1="1=0.1, 10=0.023, 100=0.0094, 1000=0.00421, 2500=0.00366 (USD)", REACH SVHC="No SVHC", Stock 1=3824601, Supplier 1=Digi-Key, Termination=SMD/SMT, Voltage Rating (DC)=50V, Width=0.8mm
SW1: "3.5mm 3.5mm SMDSplicing Black Rectangle button 50mA Surface Mount 7mm SPST 100MΩ 20000 12V 250gf@±50gf SMD Tactile Switches ROHS", LCSC Part Number=C2910695, Manufacturer=YIYUAN, Package=Custom, ComponentLink1Description=LCSC, ComponentLink1URL=https://lcsc.com/product-detail/Tactile-Switches_YIYUAN-YTS-B003-2A_C2910695.html, Item Type=Switch, Manufacturer Part Number=YTS-B003-2A
U1: "SMD MODULE, ESP32-S3, 4 MB SPI F", LCSC Part Number=C2913197, Manufacturer="Espressif Systems", Supplier Part Number 1=356-ESP32-S3WROOM1N4, Category=Uncategorized, ComponentLink1Description=LCSC, ComponentLink1URL=https://lcsc.com/product-detail/WiFi-Modules_Espressif-Systems-ESP32-S3-WROOM-1-N4_C2913197.html, Item Type=Module, Manufacturer Part Number=ESP32-S3-WROOM-1-N4, Pricing 1="1=3.15000, 10=3.15000, 50=3.15000, 100=3.15000, 1000=3.15000, 10000=3.15000 (USD)", RoHS=No, Stock 1=2246, Supplier 1=Mouser
U2: "IRM-H6 Series External Dimensions 5 x 7 x 4 mm SMT Infrared Receiver", LCSC Part Number=C91447, Manufacturer=Everlight, Max Operating Temperature=85°C, Min Operating Temperature=-25°C, Operating Supply Current=1.2mA, Operating Supply Voltage=5.5V, Package Quantity=2000, Supplier Part Number 1=5043152, Category="Optical Sensors", ComponentLink1Description=https://datasheet.ciiva.com/12418/irm-h638t-tr2-41100-12418542.pdf?src-supplier=Mouser, ComponentLink1URL=https://datasheet.ciiva.com/12418/irm-h638t-tr2-41100-12418542.pdf?src-supplier=Mouser, Item Type=IC, Lead Free="Lead Free", Manufacturer Part Number=IRM-H638T/TR2, Mount="Surface Mount", Number of Pins=4, Orientation="Top View", Packaging="Tape and Reel", Pricing 1="1000=0.53500, 2000=0.52000, 3000=0.51500, 4000=0.51000, 5000=0.49500 (USD)", RoHS=Yes, RoHS Compliant=Yes, Sensing Distance=8m, Supplier 1="Future Electronics"
U3: "SENSOR REMOTE REC 38.0KHZ 14M", Case/Package=Module, LCSC Part Number=C16216, Manufacturer=Everlight, Max Operating Temperature=80°C, Min Operating Temperature=-25°C, Min Output Voltage=2.7V, Operating Supply Current=1mA, Operating Supply Voltage=5.5V, Package Quantity=250, Supplier Part Number 1=2052908, Category="Optical Sensors", ComponentLink1Description=https://datasheet.ciiva.com/12418/irm-3636t-27149-12418050.pdf?src-supplier=Mouser, ComponentLink1URL=https://datasheet.ciiva.com/12418/irm-3636t-27149-12418050.pdf?src-supplier=Mouser, ComponentLink2Description=https://datasheet.ciiva.com/2821/irm-36xxt-series-2821351.pdf?src-supplier=Digi-Key, ComponentLink2URL=https://datasheet.ciiva.com/2821/irm-36xxt-series-2821351.pdf?src-supplier=Digi-Key, Item Type=IC, Manufacturer Part Number=IRM-3638T, Mount="Through Hole", Number of Pins=3, Orientation="Side View", Pricing 1="250=0.20500, 1500=0.19700, 5000=0.19000, 10000=0.18600, 20000=0.18000 (USD)", RoHS=Yes, RoHS Compliant=Yes, Sensing Distance=14m, Series=-, Supplier 1="Future Electronics"
U4: "600mA 60dB 500mV@(600mA) Fixed 3.3V~3.3V Positive 1 7V SOT-89(SOT-89-3) Linear Voltage Regulators (LDO) ROHS", LCSC Part Number=C171498, Manufacturer="UTC(Unisonic Tech)", Package=SOT-89(SOT-89-3), ComponentLink1Description=LCSC, ComponentLink1URL=https://lcsc.com/product-detail/Linear-Voltage-Regulators-LDO_UTC-Unisonic-Tech-LR1107G-33-AB3-C-R_C171498.html, Item Type=IC, Manufacturer Part Number=LR1107G-33-AB3-C-R

## Free pads (board coordinates)
  round 0 hole 45.67 unplated: 36(49.21,934.2) 36(1844.49,-140.6)
  round 0 hole 86.61 unplated: 36(295.28,146.8) 36(1273.62,1142.87)

## Via types
v1: diameter 23.62, hole 11.81, Top Layer to Bottom Layer, 48 vias

## Nets (pads, with @x,y where several pads share a name; then routed paths per layer and width w, separated by ;. In a path a pad name is that pad's centre, name@x,y a point inside that pad or via, vN(x,y) a via of type N, cw(c..) or ccw(c..) an arc to the next point about the centre after c; other vN are vias at no path point)
3V3: C1.1 C2.1 C9.1 J2.1 R1.2 R2.2 R11.2 U1.2 U2.4 U3.3 U4.3 | length 4423.8
  Top Layer w10: U2.4@636.17,1064 U2.4@636.67,1064.5 ; R11.2 v1(810,1240)
  Top Layer w15: C1.1 1812,1028.79 1822.79,1018 C2.1 1854.55,1017.95 1854.55,950.05 U1.2
  Top Layer w20: R2.2 v1(405,337)
  Top Layer w25: C9.1@595.11,244 U4.3@595.11,329.36 ; U2.4 U2.4@649.17,1065 ; U2.4@649.17,1064 v1(691,1064) ; J2.1 1576.8,10 1606,10 ; R1.2 v1(1615,1150.36) 1795.03,1150.36 1809.68,1135.71 1809.68,1087.32 C1.1
  Bottom Layer w15: v1(618,289) v1@618,291
  Bottom Layer w25: v1(405,337) 572,337 v1@618,291 ; U3.3@522.83,912.94 U3.3 620.94,912.94 ; v1(1606,-5) 1356,-5 1062,289 v1(618,289) 720,391 720,823 630.06,912.94 620.94,912.94 ; v1(1615,1150.36) 1525.36,1240 v1(810,1240) 678,1240 600,1162 600,1094 630,1064 v1(691,1064) 691,983 620.94,912.94
5V: C5.1 C6.1 C8.1 F1.2 LED3.1 LED5.1 LED7.1 LED9.1 P2.1 U4.2 | length 2817.1
  Top Layer w25: LED9.1 567.32,24.68 594,-2 C5.1 ; 607,423 607,417.5 613.5,411 695,411 741.09,364.91 LED3.1 ; v1(1111,800) 1111,1054 1201.57,1144.57 LED5.1 ; C6.1 1357,1299.7 1357,1371 1409,1423 1686.8,1423 LED7.1
  Bottom Layer w25: v1(427,459) 466,498 v1(520,498) 569,498 v1(570,499) v1(609,460) ; LED9.1 536,104.3 v1(536,222) ; LED3.1 1111,471.91 v1(1111,800) ; LED5.1@1214.12,1310.93 LED5.1 1201,1298.95 1201,1339 P2.1
  other v1: 469,498
EN_: C3.2 J2.6 R1.1 U1.3 | length 1362.4
  Top Layer w12: J2.6 v1(1377.95,54.68) ; C3.2 1774,1032 1805,1001 1805,950.39 U1.3
  Bottom Layer w12: v1(1377.95,54.68) 1377.95,86.95 1726.67,435.67 v1(1726.67,1032)
GND: C1.2 C2.2 C3.1 C4.1 C5.2 C6.2 C7.1 C8.2 C9.2 C10.2 C11.2 C12.2 D1.1 J1.A1/B12 J1.B1/A12 J2.2 LED1.2 LED2.2 Q1.2 R10.1 R12.1 R13.1 R14.1 SW1.2 U1.1 U1.40 U1.41 U2.1 U2.2 U3.2 U4.1 | length 6715
  Top Layer w12: J1.A1/B12@224.41,764.72 218.6,770.53 218.6,772.26 211.57,779.29 181.29,779.29 150,748 150,529 178.25,500.75 212.41,500.75 224.41,512.75 J1.B1/A12 ; R12.1@363.5,753 R12.1 ; 387.22,764.72 389,766.5 ; C8.2@474,257 C8.2 ; J2.2@1535.43,9.01 1535.43,54.57
  Top Layer w20: J1.B1/A12 236.47,513 276,513 295,494 v1(295,412) ; 389,766.5 v1(544,766.5) 544.69,765.81 544.69,703.58 544.22,703.1 D1.1 ; LED2.2 LED2.2@1515.7,98.97
  Top Layer w25: v1(78,285) 113.77,285 SW1.2 ; C4.1 v1(269,285) v1(449.72,285) 474,260.72 C8.2@474,257 ; C10.2@267.66,963.86 267.73,963.93 407.76,963.93 U2.2@407.83,964 ; 407.83,1012.94 407.83,1064 407.83,1148.83 465,1206 C7.1 ; U2.2 419.83,1012.94 U3.2@522.83,1012.94 ; 470,222 470,182 496,156 652,156 675,179 C9.2 824,244 918.3,149.7 C5.2 918.3,-89.3 981,-152 1489,-152 1535.43,-105.57 J2.2 ; C8.2 477,256 477,329.36 U4.1 ; 1528,97 1535.5,97 ; 1535.5,82.5 1535.5,97 ; U1.41 1903.04,664.57 1904.61,663 ; C3.1 1573.64,1032 1559,1046.64 1559,1287.7 C6.2 1730,1299 1894.5,1134.5 1894.5,1092.5 1902,1085 1902,1018.92 ; U1.1 1904.61,663 ; 1535.5,97 1535.5,122 1536.5,123 1853,123 1904.61,174.61 U1.40 1904.61,663
  Bottom Layer w25: v1(78,285) v1(269,285) 295,311 v1(295,412) 295,479 v1(390,574) ; U3.2@522.83,1012.94 447,937.11 447,863.5 v1(544,766.5)
IO0_: J2.5 U1.27 | length 414.4
  Top Layer w12: v1(1254.61,214.35) U1.27 ; J2.5 v1(1417.32,54.68)
  Bottom Layer w12: v1(1254.61,214.35) 1254.61,131.04 1366.15,19.5 1406.5,19.5 1417.32,30.32 v1(1417.32,54.68)
IO4_: U1.4
IO8_: P4.1 U1.12 U2.3 U3.1 | length 1153.6
  Top Layer w12: U3.1 647.03,1000.75 647.03,965.14 648.24,963.93 720.96,963.93 v1(721.03,963.86) ; U1.12 v1(1354.61,1005.39)
  Bottom Layer w12: v1(721.03,963.86) 762.56,1005.39 v1(1354.61,1005.39)
  Bottom Layer w20: P4.1 468.06,1112.94 U3.1
IO18_: P3.1 R9.2 R10.2 U1.11 | length 812.1
  Top Layer w12: R9.2@755.17,1145 R9.2 752.67,1106.33 777,1082 v1(845,1082) ; U1.11 v1(1404.61,1042.61)
  Bottom Layer w12: v1(845,1082) 1365.21,1082 v1(1404.61,1042.61)
IO37_: R4.2 U1.30 | length 324
  Top Layer w12: v1(1333,97) R4.2 ; U1.30 v1(1404.61,307.69)
  Bottom Layer w12: v1(1333,97) 1404.61,168.61 v1(1404.61,307.69)
IO38_: R3.2 U1.31 | length 170.3
  Top Layer w10: U1.31 U1.31@1455,260.63
  Top Layer w12: R3.2 1370,185 1386,201 1437,201 1455,219 U1.31@1455,260.63
IO42_: C4.2 R2.1 SW1.1 U1.35 | length 1835.1
  Top Layer w12: v1@200.5,238.33 v1(200.5,248.33) ; v1(970,248.33) 970,283 996,309 1078,309 1102,333 v1(1102,358) ; v1(1260,358) 1617,358 1654.61,320.39 U1.35
  Top Layer w20: SW1.1 120.74,114 156,114 200.5,158.5 v1@200.5,238.33 ; v1(200.5,248.33) C4.2
  Bottom Layer w12: v1(200.5,248.33) v1(970,248.33) ; v1(1102,358) v1(1260,358)
NetC7_2: C7.2 R11.1 | length 290.3
  Top Layer w10: v1(638,1113) C7.2@638,1148 ; R11.1 v1(845,1145)
  Bottom Layer w12: v1(638,1113) 670,1145 v1(845,1145)
NetJ1_A5: J1.A5 R12.2 | length 140.4
  Top Layer w10: J1.A5 297.45,687.94 323,713.5 R12.2
NetJ1_B5: J1.B5 R13.2 | length 157.8
  Top Layer w10: J1.B5 268.83,569.83 336.5,637.5 R13.2
NetLED1_1: LED1.1 R3.1 | length 48.3
  Top Layer w25: R3.1 LED1.1
NetLED2_1: LED2.1 R4.1 | length 48.3
  Top Layer w25: R4.1 LED2.1
NetLED3_2: LED3.2 LED4.1 | length 360.6
  Bottom Layer w20: LED3.2 LED4.1
NetLED4_2: LED4.2 R5.2 | length 200.7
  Top Layer w20: R5.2 921.34,1008.2 LED4.2
NetLED5_2: LED5.2 LED6.1 | length 704.6
  Bottom Layer w15: LED6.1@528.13,1333.73 632.8,1438.4 1012.45,1438.4 1101.57,1349.28 LED5.2
NetLED6_2: LED6.2 R6.2 | length 741.3
  Top Layer w15: LED6.2 456.38,1350.38 543,1437 982,1437 997.66,1421.34 R6.2
NetLED7_2: LED7.2 LED8.1 | length 1238.3
  Bottom Layer w20: LED8.1 LED7.2
NetLED8_2: LED8.2 R7.2 | length 2266.9
  Top Layer w15: R7.2 R7.2@997.66,1254.1 ; 1028.6,1254.1 1042,1267.5
  Top Layer w20: 1042,1267.5 1042,1366 1088,1412 v1(1325,1412)
  Bottom Layer w20: v1(1325,1412) 1557,1412 1819,1150 1819,216 1776.06,173.06 LED8.2
NetLED9_2: LED9.2 LED10.1 | length 652.1
  Bottom Layer w25: LED9.2 603.06,-122 990.25,-122 LED10.1
NetLED10_2: LED10.2 R8.2 | length 277.2
  Top Layer w25: R8.2 1161.66,142.34 1201.57,102.43 LED10.2
NetQ1_1: Q1.1 R9.1 | length 218.6
  Top Layer w10: Q1.1 679.6,1391.4 690.74,1380.26 690.74,1378.29 718,1351.03 718,1281 752.67,1246.33 R9.1
NetQ1_3: Q1.3 R5.1 R6.1 R7.1 R8.1 | length 1228.1
  Top Layer w10: R7.1 923,1223 960,1186 960,1128 996,1092 R5.1
  Top Layer w20: R5.1 1038.66,999.34 1073,965 v1(1073,852.66) ; R8.1 1056.17,261.83 1129.83,261.83 1148,280 v1(1148,727)
  Bottom Layer w20: v1(1073,852.66) 1110.34,852.66 1148,815 v1(1148,727)
RXD_: J2.4 U1.36 | length 480.2
  Top Layer w12: J2.4 v1(1456.69,54.68) ; U1.36 v1(1704.61,307.81)
  Bottom Layer w12: v1(1456.69,54.68) 1456.69,112.69 1651.69,307.69 1704.49,307.69 v1(1704.61,307.81)
Shell_: C10.1 J1.S1 J1.S2 J1.S3 J1.S4 R14.2 | length 669.7
  Top Layer w25: J1.S1 J1.S2 J1.S3 J1.S4
TXD_: J2.3 U1.37 | length 498.5
  Top Layer w12: J2.3 v1(1496.06,54.68) ; U1.37 v1(1754.61,307.69)
  Bottom Layer w12: v1(1496.06,54.68) 1496.06,126.06 1654,284 1730.91,284 v1(1754.61,307.69)
USB_DM: C12.1 D1.4 J1.A7 J1.B7 U1.13 | length 1602.2
  Top Layer w10: J1.A7 197.11,628.89 188,638 188,659 197.26,668.26 302.26,668.26 325,691 405,691 414,700 C12.1 C12.1@414.75,712.75 ; C12.1@414.75,713.75 v1(446.05,713.75) ; D1.4 v1(679.8,708.8) 1056.8,708.8 1141,793 1141,998 1173,1030 1272,1030 1304.61,997.39 U1.13
  Bottom Layer w10: v1(446.05,713.75) 473.8,686 657,686 v1(679.8,708.8)
USB_DP: C11.1 D1.3 J1.A6 J1.B6 U1.14 | length 1526.3
  Top Layer w10: J1.A6 309.16,648.57 ; J1.B6@252.71,609.2 271.2,609.2 326,664 ; 327,664 407,664 413,658 C11.1 v1(444.3,637.5) ; D1.3 v1(679.8,634) 1008,634 1157,783 1157,991.37 1179.63,1014 1240,1014 1254.61,999.39 U1.14
  Bottom Layer w10: v1(444.3,637.5) 472.8,666 647.8,666 v1(679.8,634)
VUSB: D1.2 F1.1 J1.A4/B9 J1.B4/A9 | length 716.9
  Top Layer w12: J1.B4/A9 231.31,549.16 192.84,549.16 171,571 171,707 192.31,728.31 231.31,728.31 J1.A4/B9 J1.A4/B9@236.61,733.61 ; J1.B4/A9@252.11,544.13 252.82,543.42 302.58,543.42 ; v1@279.61,733.61 v1(280,734) ; F1.1@352.42,521.12 F1.1 ; v1(489,734) 489,648 503,634 D1.2
  Bottom Layer w12: v1(280,734) 297,751 472,751 v1(489,734)
pads on no net: J1.A8 J1.B8 J1.MH J2.MP1 J2.MP2 SW1.3 SW1.4 SW1.5 SW1.6 SW1.MH0 SW1.MH1 U1.5 U1.6 U1.7 U1.8 U1.9 U1.10 U1.15 U1.16 U1.17 U1.18 U1.19 U1.20 U1.21 U1.22 U1.23 U1.24 U1.25 U1.26 U1.28 U1.29 U1.32 U1.33 U1.34 U1.38 U1.39

## Polygon pours and split planes (outlines as drawn)
GND on Top Layer "GND_L01_P000" (solid, pour order 0): 332,1448 1950,1448 1950,-168 332,-168 332,6 8,6 8,1025 332,1025
GND on Bottom Layer "GND_L02_P001" (solid, remove dead copper, pour order 1): 332,1448 1950,1448 1950,-168 332,-168 332,6 8,6 8,1025 332,1025

## Other copper
Top Layer:
  rectangle net GND: 231,861 448,1002.86
  rectangle net 3V3: 1562,-24.59 1625,40
  rectangle net VUSB: 323,498 376,553
  rectangle net VUSB: 212.61,531.63 340,556.63
  rectangle net GND: 213,752.5 363.5,777.5
  rectangle net VUSB: 213,721 292,746
  region net GND: 491.11,364 424,364 424,210 491.11,210
  rectangle net 5V: 443,377 626,470
  rectangle net GND: 1503,83 1550,172
  rectangle net GND: 1522,-6 1549,171
  rectangle net NetLED8_2: 975,1164 1053,1277
  rectangle net 5V: 402,432 626,542
  rectangle net GND: 359,949 448,1098
  rectangle net GND: 353,562 430,611
  rectangle net 5V: 498,210 568,364
  rectangle net GND: 844,-62 993,41
  rectangle net 3V3: 582,214 630,364
  rectangle net GND: 658,1189 698,1335
  rectangle net Shell_: 133.66,796 203,1002.86
  rectangle net GND: 351,741 430,778
  rectangle net IO42_: 172,269 212,358
  rectangle net IO18_: 674.33,1128 774.33,1164
  rectangle net GND: 617,1189 717,1225
  rectangle net NetQ1_3: 736,1337 898,1371
  rectangle net NetQ1_3: 854,1168 906,1408
  rectangle net 5V: 1170,1265 1429,1334
  rectangle net EN_: 1659,1011 1694,1111
  rectangle net GND: 1882,230 1922,1119

## Silkscreen, mask and mechanical layers (free items; w line width, h text height)
Top Overlay:
  drawing of 310 lines, arcs and shapes, not listed
  text "*" at 346,1225.5 h45
  text "*" at 1706.3,1181.01 h45 r45
  text "*" at 1135,1132.5 h45
  text "rev.B" at 335.47,918 h60 r90
  text "JLCJLCJLCJLC" at 1897.7,799 h60 r270
  text "*" at 984,705.5 h45
  text "*" at 984,514.5 h45
  text "*" at 1565,134.5 h45
  text "*" at 1198,98.5 h45
  text "*" at 571,82.5 h45
  text "*" at 1566,75.5 h45
  text "*" at 1725.3,73.01 h45 r45
Bottom Overlay:
  drawing of 3070 lines, arcs and shapes, not listed
  text "5V" at 1204,1343 h100
  text "IO8" at 621,1148 h100
  text "IO18" at 1362,1001.79 h100
  text "IR Blaster" at 1544.12,794 h100 r90
  text "rev.B" at 1615.12,721 h100 r90
  text "ZERO CARBON FOOTPRINT" at 963,381 h40
  text "Note:" at 1726,-77.82 h85
  text "* >> LED" at 1726,-153.65 h85
Board Outline:
  lines w10: 1844.49,-140.6 1958.66,-140.6 1958.66,-178 ; 1958.66,-178 324.8,-178 324.8,-0.83 0,-0.83 0,1032.63 324.8,1032.63 324.8,1455.86 1958.66,1455.86 1958.66,-178

## Dimensions
0,1032.63 to 0,-0.83 on Dimension
324.8,1455.86 to 0,1032.63 on Dimension
324.8,-178 to 0,-0.83 on Dimension
1958.66,1455.86 to 1958.66,-178 on Dimension
1958.66,1455.86 to 324.8,1455.86 on Dimension

## Text inside footprints (layer, text, board x,y; h text height)
J1: Top Overlay "Board Edge" at 52.55,768.72 h25 r270